# Altium PCB RADAR_D79_POWER_24V_v0.9.3.36_R10_3_36_IMPEDANCE_CLEAR_ROUTE_NATIVE.PcbDoc (part 5 of 9)
Units mil, origin at the board's own origin, x right, y up, seen from the top; angles counter-clockwise.
Board outline 3110.24 x 3110.24 mil, 10 copper layers (Top Layer, RF_GND, SIG_A0, SIG_A1, PWR_A, PWR_B, SIG_B1, SIG_B0, DIGITAL_GND, Bottom Layer), stack 79.002 mil thick; 304 components, 269 nets, 1408 pads, 1372 vias.
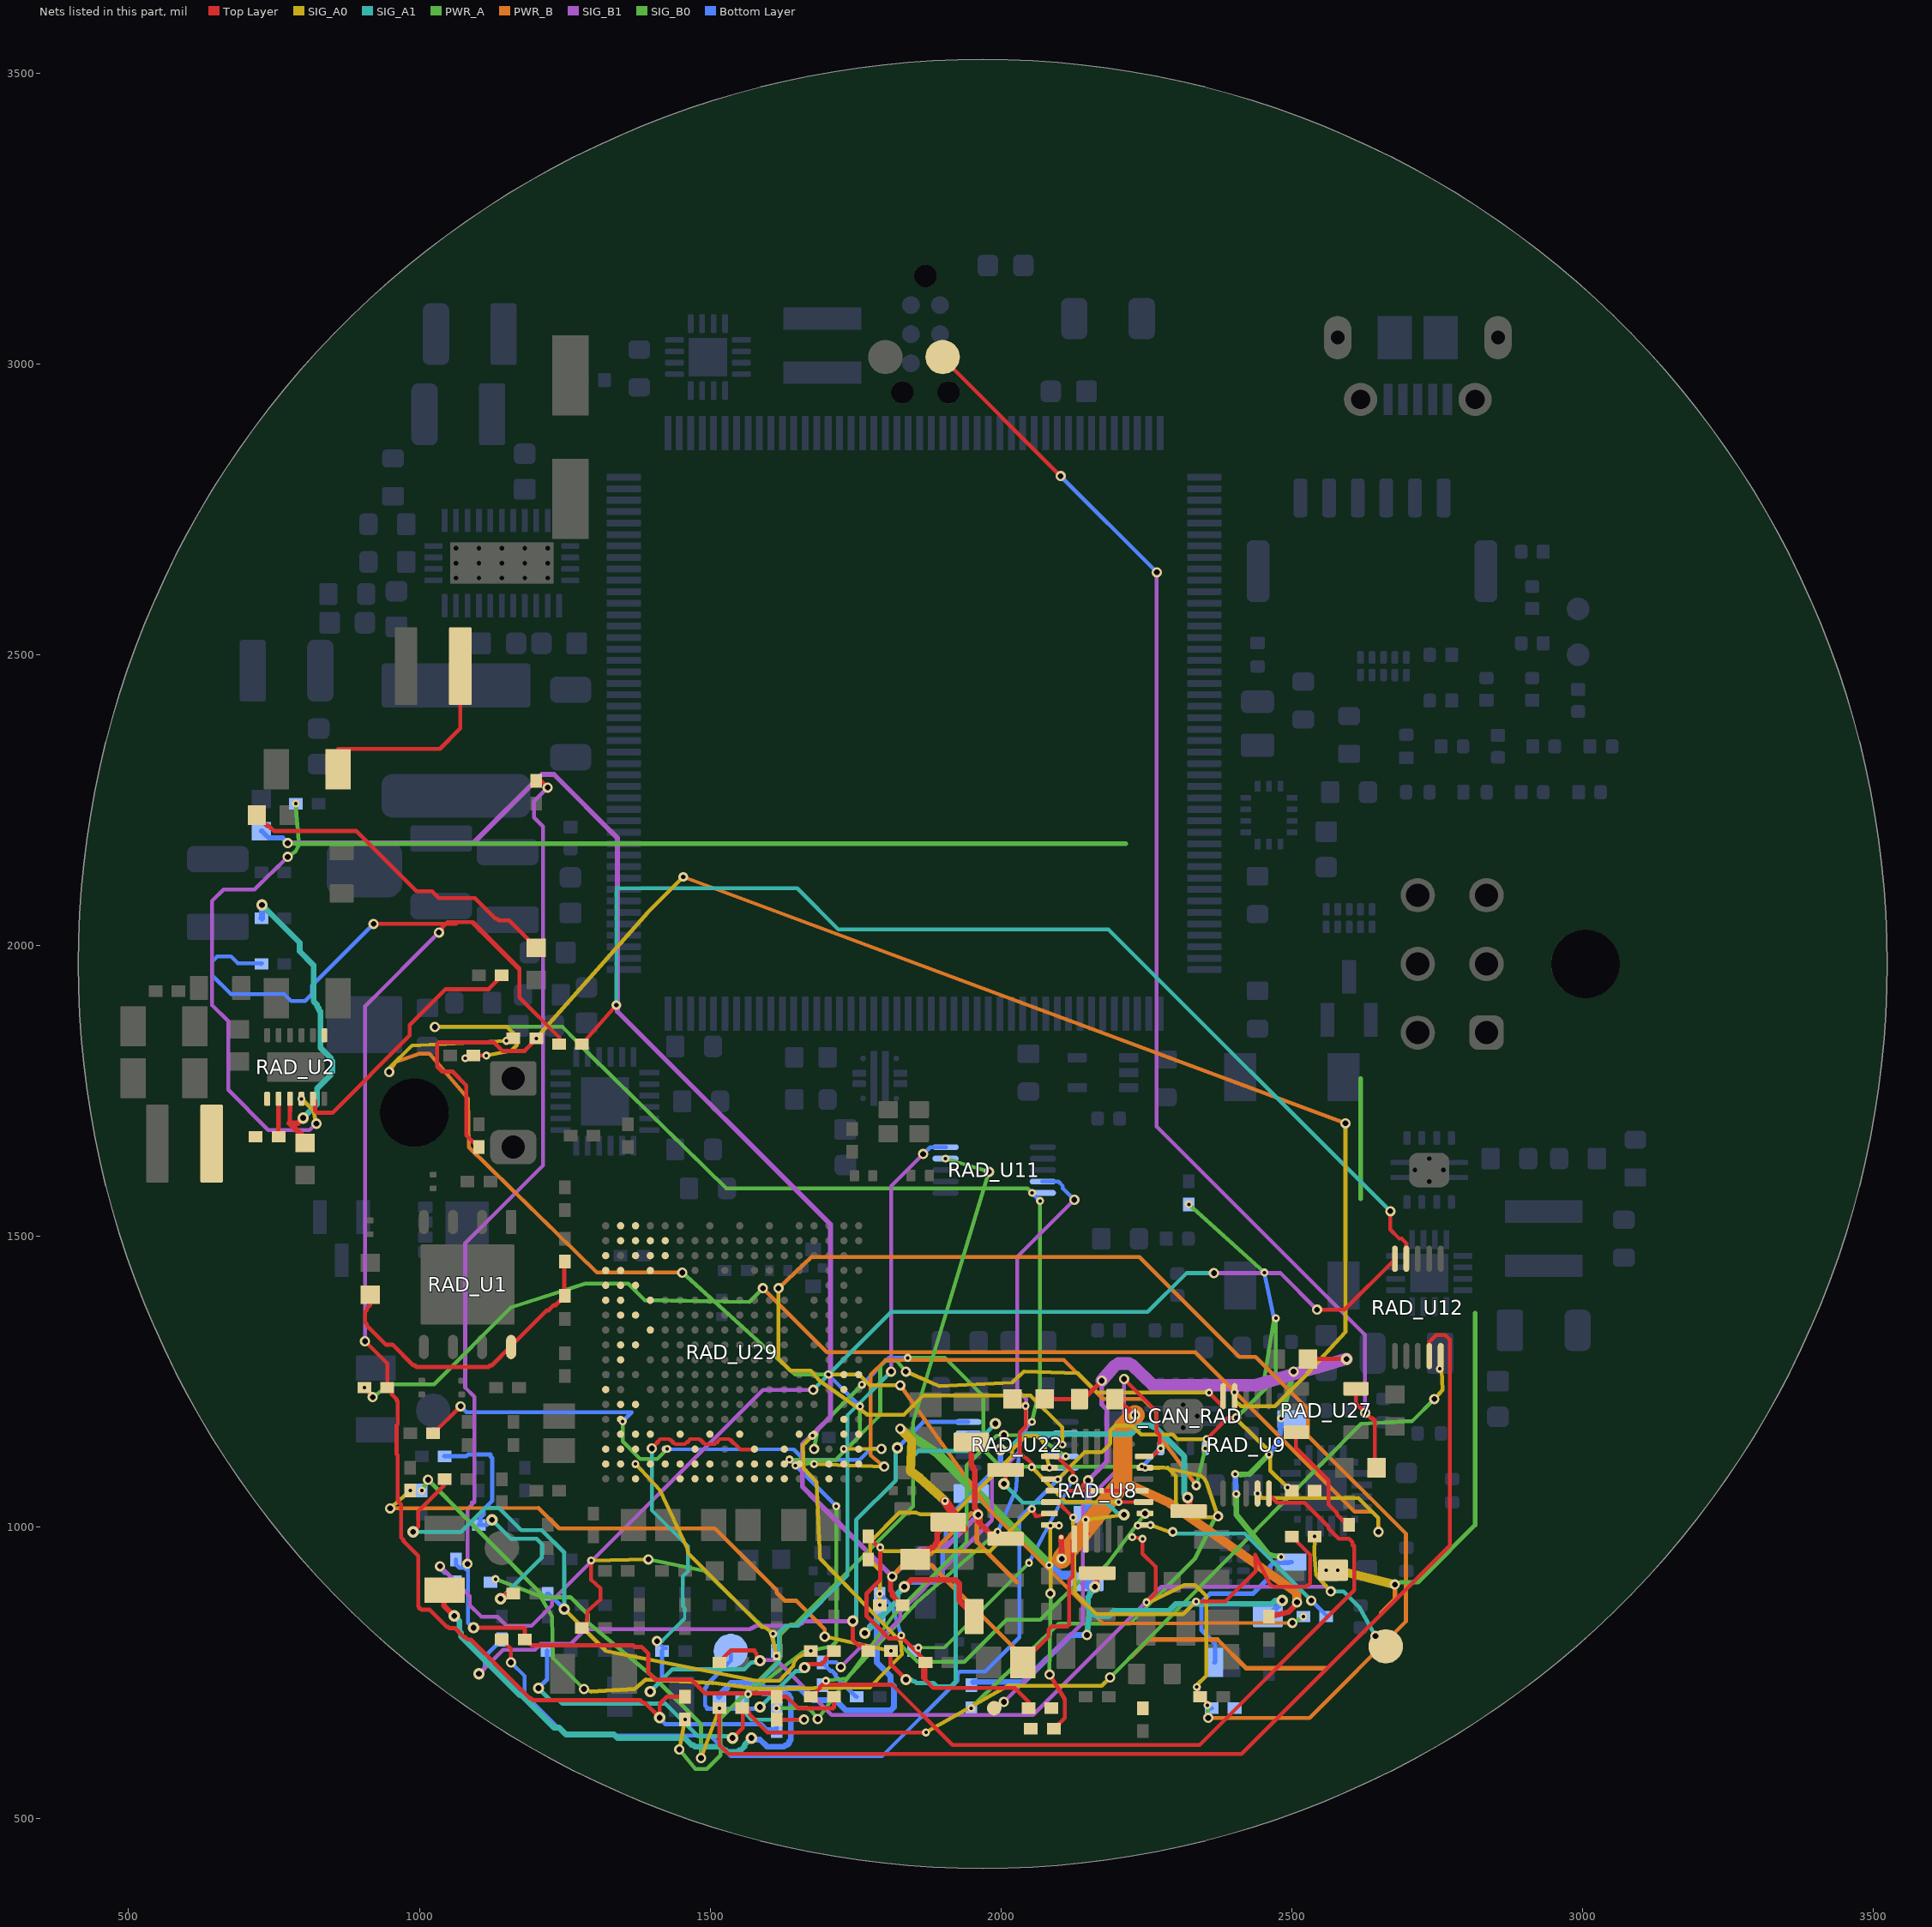
[diagram p13: the nets of this part, all layers, seen from the top]

## Via types
v1: diameter 13.77, hole 5.9, Top Layer to SIG_A0, tented both sides, 393 vias
v2: diameter 17.72, hole 9.84, Top Layer to Bottom Layer, tented both sides, 188 vias
v3: diameter 13.77/13.77/13.77 (per signal layer), hole 5.9, Top Layer to SIG_A0, tented both sides, 120 vias
v4: diameter 13.77, hole 5.9, Top Layer to SIG_A0, tented top, 104 vias
v5: diameter 19.68, hole 9.84, Top Layer to Bottom Layer, 103 vias
v6: diameter 19.68, hole 9.84, Top Layer to Bottom Layer, tented both sides, 93 vias
v7: diameter 13.78, hole 5.91, Top Layer to SIG_A0, tented both sides, 83 vias
v8: diameter 13.78, hole 5.91, SIG_B0 to Bottom Layer, tented both sides, 74 vias
v9: diameter 13.78, hole 5.91, Top Layer to SIG_A0, tented bottom, 55 vias
v10: diameter 13.78, hole 5.91, SIG_B0 to Bottom Layer, tented top, 43 vias
v11: diameter 16.54, hole 7.87, SIG_B0 to Bottom Layer, tented both sides, 22 vias
v12: diameter 22.05, hole 11.81, Top Layer to Bottom Layer, tented both sides, 17 vias
v13: diameter 17.72, hole 9.84, Top Layer to Bottom Layer, 14 vias
v14: diameter 16.54, hole 7.87, Top Layer to Bottom Layer, tented both sides, 11 vias
v15: diameter 18.11, hole 9.06, Top Layer to Bottom Layer, 7 vias
v16: diameter 22.83, hole 11.81, Top Layer to Bottom Layer, 6 vias
v17: diameter 22.05, hole 11.81, Top Layer to Bottom Layer, 6 vias
v18: diameter 22.83, hole 11.81, Top Layer to Bottom Layer, tented both sides, 5 vias
v19: diameter 17.32, hole 8.66, Top Layer to Bottom Layer, 3 vias
v20: diameter 20.47, hole 9.84, Top Layer to Bottom Layer, 3 vias
v21: diameter 16.54, hole 7.87, Top Layer to Bottom Layer, 3 vias
v22: diameter 22.05, hole 11.02, Top Layer to Bottom Layer, 2 vias
v23: diameter 19.68, hole 11.81, Top Layer to Bottom Layer, 2 vias
v24: diameter 19.68, hole 9.84, SIG_A1 to Bottom Layer, 2 vias
v25: diameter 16.54, hole 7.87, SIG_A1 to SIG_B1, tented both sides, 2 vias
v26: diameter 16.54, hole 7.87, Top Layer to SIG_A1, 2 vias
v27: diameter 13.78, hole 5.91, Top Layer to SIG_A0, 2 vias
v28: diameter 18, hole 9.84, Top Layer to Bottom Layer, tented both sides, 1 vias
v29: diameter 18.11, hole 9.06, Top Layer to Bottom Layer, tented both sides, 1 vias
v30: diameter 19.68, hole 9.84, SIG_B0 to Bottom Layer, tented both sides, 1 vias
v31: diameter 17.32, hole 7.87, Top Layer to Bottom Layer, tented both sides, 1 vias
v32: diameter 17.32, hole 7.87, SIG_A1 to Bottom Layer, tented both sides, 1 vias
v33: diameter 19.68, hole 9.84, SIG_B1 to Bottom Layer, 1 vias
v34: diameter 16.54, hole 7.87, SIG_A0 to PWR_B, tented both sides, 1 vias

## Nets (pads, with @x,y where several pads share a name; then routed paths per layer and width w, separated by ;. In a path a pad name is that pad's centre, name@x,y a point inside that pad or via, vN(x,y) a via of type N, cw(c..) or ccw(c..) an arc to the next point about the centre after c; other vN are vias at no path point) (continued)
TI_3V3REG_VCC: RAD_C10.1 RAD_R9.2 RAD_U2.3 | length 570
  Top Layer w8: 777.47,1694.53 777.25,1694.75 777.25,1715.25 777.56,1715.25 RAD_U2.3@777.56,1736.61
  Top Layer w9.84: 777.47,1694.53 776.57,1694.88 791.34,1694.88 v5(800.2,1703.74)
  Top Layer w10: 777.47,1694.75 777.47,1694.53 RAD_C10.1@803.56,1668.44
  SIG_A1 w9.84: v6(729.33,2069.88) 794.29,2004.92 794.29,1990.16 817.91,1966.54 817.91,1904.53 823.82,1898.62 823.82,1895.67 826.77,1892.72 826.77,1889.76 829.72,1886.81 829.72,1824.8 847.44,1807.09 847.44,1804.13 850.39,1801.18 850.39,1783.46 847.44,1780.51 847.44,1777.56 823.82,1753.94 823.82,1727.36 v5(800.2,1703.74)
  Bottom Layer w9.84: RAD_R9.2@728.35,2047.24 729.33,2046.26 v6(729.33,2069.88)
TI_5V0: RAD_C119.1 RAD_U8.10 | length 265.3
  Top Layer w7.09: RAD_C119.1@2037.4,767.72 2081.69,812.01 2081.69,823.82 2087.6,829.72 2114.17,829.72 2117.13,832.68 2117.13,909.45 2123.03,915.35 2123.03,977.36 2125.98,980.32 RAD_U8.10@2125.98,979.82
TI_+3.3VD: RAD_C124.2 RAD_R116.1 RAD_U8.9 | length 802
  Top Layer w9.84: RAD_U8.9@2103.41,983.08 v2(2104.33,945.87) ; RAD_C124.2@2195.87,1220.47 v2(2230.32,1192.91) ; RAD_R116.1@2460.63,846.46 2494.09,854.33 2502.95,863.19 v2(2508.86,871.06)
  PWR_B w15.75: 2209.25,1078.94 2288.19,1042.52 2505.51,889.76 2508.66,883.46 v2(2508.86,871.06)
  PWR_B w33.46: v2(2104.33,945.87) 2209.25,1078.94 2209.25,1171.06 v2(2230.32,1192.91)
TI_AGND: RAD_C3.1 RAD_C123.1 RAD_C124.1 RAD_NT1.2 RAD_NT2.1 RAD_NT3.1 RAD_NT4.1 RAD_U8.5 RAD_U8.5-19 RAD_U8.19 | length 1816.1
  Top Layer w7.09: RAD_C123.1@2074.8,1220.47 RAD_C124.1@2134.84,1220.47 ; RAD_U8.5@2088.58,1062.99 RAD_U8.19@2242.13,1062.99 ; RAD_C3.1@2527.56,1289.37 v5(2594,1289.37)
  Top Layer w7.87: 2126.97,1062.99 2125.98,1062.99 2131.89,1062.99 v2(2149.61,1080.71) ; RAD_C124.1@2134.84,1220.47 2134.84,1219.49 2140.75,1219.49 v2(2173.23,1251.97)
  SIG_B1 w7.87: v2(2149.61,1080.71) 2182.09,1113.19 2182.09,1201.77 2173.23,1210.63 v2(2173.23,1251.97)
  SIG_B1 w9.84: 2468.88,1253.31 v2(2502.95,1267.72)
  SIG_B1 w21.65: v2(2173.23,1251.97) 2195.08,1277.36 2201.97,1281.5 2219.88,1281.5 2225.39,1278.74 2261.22,1244.29 2437.6,1244.29 v5(2594,1289.37)
  SIG_B0 w9.84: v8(2402.56,1091.54) 2412.4,1090.55 2427.17,1091.54 v8(2460.63,1125) ; v8(2404.53,1057.09) 2404.53,1021.65 2460.63,952.76 v10(2481.3,948.9) ; v10(2481.3,1187.01) v2(2502.95,1267.72)
  Bottom Layer w7.09: RAD_NT1.2@2496,940.2 RAD_NT1.2@2500,940.2
  Bottom Layer w7.87: RAD_NT4.1@2366.89,767.72 2368.11,767.72 2368.11,800.2 2344.49,823.82 2344.49,871.06 2359.25,885.83 2433.07,885.83 2462.6,915.35 2462.6,933.07 2468.5,938.98 2495.08,938.98 RAD_NT1.2@2496,940.2
  Bottom Layer w9.84: v8(2402.56,1091.54) v8(2404.53,1057.09) ; v8(2460.63,1125) 2478.35,1148.62 2481.3,1177.09 v10(2481.3,1187.01)
  Bottom Layer w11.81: RAD_NT3.1@2149.61,1021.65 v2(2149.61,1080.71)
TI_AR_NERROUT: RAD_R76.1 RAD_U29.C11 | length 1017.1
  PWR_B w6.69: v2(1826.77,1244.09) 1978.35,1031.5 2175.2,834.65 v2(2500.98,835.63)
  SIG_A0 w6.69: v9(1704.16,1262.39) 1756.32,1262.39 1774.61,1244.09 v2(1826.77,1244.09)
  SIG_B0 w6.69: v2(2500.98,835.63) v10(2519.69,846.46)
TI_AR_NRST: RAD_C105.2 RAD_R99.1 RAD_R264.1 RAD_U29.H16 TP_RAD_RESET.1 | length 2378.5
  Top Layer w6.3: v2(1399.61,1135.63) 1406.69,1142.72 1406.69,1144.49 1408.46,1144.49 1408.46,1146.26 1410.24,1146.26 1410.24,1148.03 1412.01,1148.03 1412.01,1149.8 1413.78,1151.57 1429.72,1151.57 1431.5,1149.8 1433.27,1149.8 1433.27,1148.03 1435.04,1148.03 1435.04,1146.26 1436.81,1146.26 1436.81,1144.49 1438.58,1144.49 1440.35,1142.72 1456.3,1142.72 1459.84,1146.26 1461.61,1146.26 1461.61,1148.03 1463.39,1148.03 1463.39,1149.8 1465.16,1151.57 1481.1,1151.57 1482.87,1149.8 1484.65,1149.8 1484.65,1148.03 1486.42,1148.03 1486.42,1146.26 1488.19,1146.26 1488.19,1144.49 1489.96,1144.49 1491.73,1142.72 1507.68,1142.72 1511.22,1146.26 1512.99,1146.26 1512.99,1148.03 1516.54,1151.57 1532.48,1151.57 1534.25,1149.8 1536.02,1149.8 1536.02,1148.03 1537.8,1148.03 1537.8,1146.26 1539.57,1146.26 1539.57,1144.49 1541.34,1144.49 1551.97,1133.86 1576.77,1133.86 RAD_U29.H16@1576.21,1134.44
  Top Layer w7.09: RAD_R264.1@1515.75,767.72 1514.76,767.72 1535.43,788.39 1576.77,788.39 1576.77,785.43 1579.72,782.48 1579.72,776.57 v5(1585.63,770.67) ; v2(2643.7,812.99) TP_RAD_RESET.1@2661.42,795.28
  SIG_A0 w6.69: v9(2539.37,984.25) 2538.39,953.74 2541.34,918.31 v2(2566.93,889.76)
  SIG_A1 w6.3: v2(1399.61,1135.63) 1399.61,1029.33 1461.61,967.32 1461.61,924.8 1452.76,915.94 1452.76,864.57 1456.3,861.02 1456.3,843.31 1417.32,804.33 v2(1408.46,804.33)
  SIG_A1 w7.09: v5(1396.65,717.52) 1435.04,755.91 1559.06,755.91 1570.87,767.72 1582.68,767.72 v5(1585.63,770.67) ; v2(2566.93,889.76) 2588.58,889.76 2616.14,862.2 v2(2643.7,812.99)
  SIG_B1 w6.69: v5(1585.63,770.67) 1586.61,771.65 1614.17,771.65 1708.66,677.17 2055.12,677.17 2275.59,897.64 2559.06,897.64 v2(2566.93,889.76)
  Bottom Layer w6.3: v2(1408.46,804.33) 1420.87,791.93 1424.41,791.93 RAD_C105.2@1424.61,792.72
  Bottom Layer w7.09: v5(1396.65,717.52) 1417.32,738.19 1417.32,788.39 RAD_C105.2@1417.32,787.4
TI_AR_WRMRST: RAD_U29.B12
TI_BSS_UARTA_TX: RAD_U29.M16
TI_CANA_NSTB: RAD_R13.1
TI_CANB_NSTB: RAD_R17.1
TI_CSI2_RX0_0_N: RAD_U29.N18
TI_CSI2_RX0_0_P: RAD_U29.N17
TI_CSI2_RX0_1_N: RAD_U29.M18
TI_CSI2_RX0_1_P: RAD_U29.M17
TI_CSI2_RX0_CLK_N: RAD_U29.L18
TI_CSI2_RX0_CLK_P: RAD_U29.L17
TI_DSS_UARTA_RX: RAD_U29.B14
TI_DSS_UARTA_TX: RAD_U29.A15
TI_FB_B1: RAD_R14.1 RAD_U8.3 | length 547.5
  SIG_A0 w6.69: v7(1791.34,866.14) 1792.13,925.98 1774.8,943.31 1774.8,974.8 1825.2,1025.2 1853.54,1025.2 1861.42,1022.05 1918.11,1022.05 2018.9,1122.83 2018.9,1133.86 2042.52,1157.48 2061.42,1157.48 2072.44,1146.46 v7(2083.17,1102.36)
TI_FB_B2: RAD_R71.1 RAD_U8.21 | length 927.3
  SIG_A0 w6.69: v7@2245.67,1100.79 2286.61,1102.36 2300.79,1088.19 2300.79,1040.94 2324.41,1017.32 v2@2368.5,1017.32 ; v7(2247.54,1102.36) 2280.02,1102.36 2343.5,1088.58 2349.9,1083.66 2352.85,1078.25 v2(2373.03,1018.7)
  SIG_B0 w6.69: v8@1949.61,691.34 2099.21,834.65 2222.05,834.65 2333.86,946.46 v2@2368.5,1017.32
  other v8: 1948.82,688.98
TI_FB_B3: RAD_R291.1 RAD_U8.17 | length 644.3
  SIG_B0 w6.69: v8(1828.35,814.17) 1828.35,796.85 1856.69,768.5 1937.01,768.5 2009.45,840.94 2067.72,840.94 2144.88,918.11 2163.78,918.11 2184.25,938.58 v2(2247.54,1023.62)
  Bottom Layer w6.69: v8(1791.34,885.83) 1812.6,864.57 v8(1828.35,814.17)
TI_GPADC1: RAD_U29.P3
TI_GPADC2: RAD_U29.P2
TI_GPADC3: RAD_U29.R3
TI_GPADC4: RAD_U29.R2
TI_GPADC5: RAD_U29.T3
TI_GPADC6: RAD_U29.U2
TI_GPADC7: RAD_U29.T1
TI_GPADC8: RAD_U29.T2
TI_GPADC9: RAD_U29.U1
TI_GPIO_3: RAD_U29.P16
TI_GPIO_4: RAD_U29.L15
TI_GPIO_8: RAD_U29.T18
TI_GPIO_9: RAD_U29.N15
TI_GPIO_30: RAD_U29.P17
TI_GPIO_31: RAD_U29.U17
TI_LVDS_TX0_N: RAD_U29.F18
TI_LVDS_TX0_P: RAD_U29.F17
TI_LVDS_TX1_N: RAD_U29.J18
TI_LVDS_TX1_P: RAD_U29.J17
TI_LVDS_TX2_CLK_N: RAD_U29.G18
TI_LVDS_TX2_CLK_P: RAD_U29.G17
TI_LVDS_TX3_FRCLK_N: RAD_U29.H18
TI_LVDS_TX3_FRCLK_P: RAD_U29.H17
TI_MCU_CLK_OUT: RAD_U29.R15
TI_MSS_EPWMA0: RAD_U29.E15
TI_MSS_EPWMA1: RAD_U29.C18
TI_MSS_EPWMB0: RAD_U29.C17
TI_MSS_GPIO_0: RAD_U29.B15
TI_MSS_GPIO_1: RAD_U29.A16
TI_MSS_GPIO_11: RAD_U29.J15
TI_MSS_GPIO_28: RAD_U29.R17
TI_MSS_I2CA_SCL: RAD_R27.2 RAD_R33.2 RAD_R57.2 RAD_R58.2 RAD_R276.1 | length 2325.4
  Top Layer w6.69: RAD_R276.1@1200.79,2283.46 1208.66,2283.46 v2(1220.47,2271.65)
  Top Layer w7.09: v5(1093,827.28) 1180,827.28 1181.1,826.18 RAD_R57.2@1181.1,807.09 1181.1,806.1 1187.01,800.2 1189.96,800.2 1192.91,797.24 1367.13,797.24 1370.08,794.29 1381.89,794.29 1393.7,782.48 1393.7,750 1405.51,738.19 1467.52,738.19 1491.14,714.57 1609.25,714.57 1615.16,708.66 RAD_R33.2@1614.17,708.66 1631.34,708.66 1651,689 1711.6,689 1712.6,690 RAD_R27.2@1712.6,708.66
  SIG_B1 w6.69: v2(1082.68,937.01) 1082.68,1031.5 1090.55,1039.37 1090.55,1043.31 1094.49,1043.31 1094.49,1224.41 1078.74,1240.16 1078.74,1488.19 1212.6,1622.05 1212.6,2204.72 1196.85,2220.47 1196.85,2248.03 v2(1220.47,2271.65)
  Bottom Layer w6.69: v2(1082.68,937.01) 1082.68,925.2 1083.66,927.16
  Bottom Layer w7.09: RAD_R58.2@1062.99,944.88 1062.99,937 1062.99,936.02 1068.9,930.12 1077.76,930.12 1080.71,927.17 1083.66,927.17 1083.66,835.63 1092.52,826.77 v5(1093,827.28)
TI_MSS_I2CA_SDA: RAD_R29.2 RAD_R35.2 RAD_R59.2 RAD_R62.2 RAD_R277.1 | length 3308.9
  Top Layer w6.3: v2(906.5,1319.88) 944.88,1281.5 RAD_R29.2@944.88,1240.16 ; v2(1033.46,2022.64) 1039.37,2028.54 1039.37,2031.5 1048.23,2040.35 1089.57,2040.35 1172.24,1957.68 1172.24,1910.43 1240.16,1842.52 RAD_R59.2@1240.16,1830.71
  Top Layer w6.69: v2(921.26,2037.4) 1062.99,2037.4 1065.94,2040.35 1092.52,2040.35 1172.24,1960.63 1172.24,1910.43 1240.16,1842.52 RAD_R59.2@1240.16,1830.71
  Top Layer w7.09: RAD_R29.2@944.88,1240.16 952.76,1232.28 952.76,1228.35 960.63,1220.47 960.63,1218.5 962.6,1216.54 962.6,1177.17 960.63,1175.2 960.63,1125.98 962.6,1124.02 962.6,1047.24 964.57,1045.28 964.57,1043.31 968.5,1039.37 968.5,982.28 972.44,978.35 972.44,976.38 998.03,950.79 998.03,864.17 1000,862.2 1000,860.24 1001.97,860.24 1003.94,858.27 1017.72,858.27 1047.24,828.74 1049.21,828.74 1051.18,826.77 1061.02,826.77 1076.77,811.02 1078.74,811.02 1082.68,807.09 1088.58,807.09 1188.98,706.69 1190.94,706.69 1194.88,702.76 1379.92,702.76 1383.86,698.82 1385.83,698.82 1387.8,696.85 1389.76,696.85 1413.39,673.23 v5(1413,672.68) 1413,696.16 1425.5,708.66 RAD_R35.2@1456.69,708.66
  SIG_B1 w6.3: v2(906.5,1319.88) 906.5,1895.67 v2(1033.46,2022.64)
  Bottom Layer w6.69: RAD_R277.1@728.35,1968.5 729.33,1969.49 687.99,1969.49 676.18,1981.3 652.56,1981.3 643.7,1972.44 643.7,1948.82 676.18,1916.34 767.72,1916.34 779.53,1904.53 803.15,1904.53 814.96,1916.34 814.96,1931.1 v2(921.26,2037.4)
  Bottom Layer w7.09: v5(1413,672.68) 1414.37,673.23 1417.32,670.28 1417.32,667.32 1423.23,661.42 1588.58,661.42 1597.44,652.56 1612.2,652.56 1615.16,649.61 RAD_R62.2@1614.17,649.61 1614.17,663.59 1613,664.76
TI_MSS_MCANA_RX: RAD_U29.D16 U_CAN_RAD.4 | length 818.4
  SIG_B0 w6.69: v13(1678.57,1134.44) 1685.04,1169.29 v8(1760.83,1245.08) ; v8(1839.57,1291.34) 1903.54,1291.34 1969.49,1225.39 1969.49,1133.86 1999.02,1104.33 v8(2242.13,1104.33)
  Bottom Layer w6.69: v8(1760.83,1245.08) 1807.09,1291.34 v8(1839.57,1291.34) ; v8(2242.13,1104.33) U_CAN_RAD.4@2273.23,1135.83
  other v10: 2274.61,1135.83
TI_MSS_MCANA_TX: RAD_U29.D17 U_CAN_RAD.1 | length 1042.8
  PWR_B w6.69: v2(1799.21,1104.33) 1775.59,1124.02 1775.59,1261.81 1801.18,1287.4 2108.27,1287.4 2175.2,1220.47 2244.09,1220.47 2267.72,1196.85 2267.72,1163.39 v14(2335.63,1071.85)
  SIG_A0 w6.69: v9(1678.57,1108.85) v2(1799.21,1104.33)
  SIG_B0 w6.69: v14(2335.63,1071.85) v10(2351.38,1135.83)
TI_MSS_MCANB_RX: RAD_U29.A17
TI_MSS_MCANB_TX: RAD_U29.B17
TI_MSS_MDIO_CLK: RAD_U29.R4
TI_MSS_MDIO_DATA: RAD_U29.T5
TI_MSS_RGMII_RCLK: RAD_U29.T9
TI_MSS_RGMII_RCTL: RAD_U29.T7
TI_MSS_RGMII_RD0: RAD_U29.V6
TI_MSS_RGMII_RD1: RAD_U29.V4
TI_MSS_RGMII_RD2: RAD_U29.V5
TI_MSS_RGMII_RD3: RAD_U29.U10
TI_MSS_RGMII_TCLK: RAD_U29.V3
TI_MSS_RGMII_TCTL: RAD_U29.R6
TI_MSS_RGMII_TD0: RAD_U29.U7
TI_MSS_RGMII_TD1: RAD_U29.U5
TI_MSS_RGMII_TD2: RAD_U29.U6
TI_MSS_RGMII_TD3: RAD_U29.U4
TI_MSS_RS232RX: RAD_U29.F16
TI_MSS_RS232TX: RAD_U29.E17
TI_MSS_SPIA_CLK: RAD_U29.T16
TI_MSS_SPIA_CS0: RAD_U29.T15
TI_MSS_SPIA_HOSTIRQ: RAD_U29.V17
TI_MSS_SPIA_MOSI: RAD_U29.U15
TI_MSS_SPIB_CS0: RAD_U29.U14
TI_MSS_SPIB_CS1: RAD_U29.V16
TI_MSS_SPIB_MISO: RAD_U29.U13
TI_MSS_UARTA_RX: RAD_R129.1 RAD_U29.B16 | length 966.9
  Top Layer w6.69: RAD_R129.1@1023.62,1161.42 1024.02,1161.22 v13(1070.87,1208.07)
  SIG_A0 w6.3: v9(1729.75,1134.44) v13(1794.29,1134.84)
  SIG_B0 w6.69: v8(1349.41,1182.09) 1349.41,1147.64 1379.92,1117.13 1408.46,1117.13 v8(1426.18,1134.84)
  Bottom Layer w6.69: v13(1070.87,1208.07) 1080.91,1198.03 1365.35,1198.03 v8(1349.41,1182.09) ; v8(1426.18,1134.84) 1428.94,1134.45 1643.7,1133.86 1661.42,1116.14 1738.19,1116.14 1756.89,1116.14 1775.59,1134.84 v13(1794.29,1134.84)
TI_NERR_MCU: RAD_R76.2 RAD_U8.16 | length 388.5
  Top Layer w6.69: v7(2235.24,1002.95) 2246.08,1003.34 v7(2257.09,1003.74) ; RAD_U8.16@2246.06,1003.94 RAD_U8.16@2247.05,1003.94
  SIG_A0 w6.69: v7(2257.09,1003.74) v14@2297.64,988.98
  SIG_A1 w6.69: v14@2297.64,988.98 2418.9,988.98 v2(2533.46,874.02)
  Bottom Layer w6.69: v2(2533.46,874.02) 2560.04,847.44 RAD_R76.2@2559.06,846.46
  other v14: 2295.28,992.13
TI_NetC1_2: RAD_C1.2 RAD_C2.2 RAD_R37.2 RAD_U1.8 | length 540
  Top Layer w7.09: RAD_C1.2@915.35,1399.61 915.35,1381.89 909.45,1375.98 909.45,1373.03 906.5,1370.08 906.5,1352.36 909.45,1349.41 909.45,1346.46 941.93,1313.98 953.74,1313.98 989.17,1278.54 992.13,1278.54 995.08,1275.59 1119.09,1275.59 1122.05,1278.54 1125,1278.54 RAD_U1.8@1157.48,1311.02 ; RAD_U1.8@1157.68,1309.98 RAD_U1.8@1157.48,1311.02 ; RAD_C2.2@1250,1397.64 RAD_C2.2@1249.02,1396.65 ; RAD_R37.2@1250,1456.69 1249.02,1455.71 RAD_C2.2@1249.02,1396.65 ; RAD_U1.8@1157.48,1311.02 1219.49,1373.03 1222.44,1373.03 1231.3,1381.89 1234.25,1381.89 RAD_C2.2@1249.02,1396.65
TI_NetC14_1: RAD_C14.1 RAD_R26.2 RAD_U9.9 | length 2626
  Top Layer w6.69: RAD_U9.9@2401.57,1225.39 v9(2401.57,1232.28)
  Top Layer w7.09: RAD_R26.2@1102.36,1653.54 1101.38,1653.54 1080.71,1674.21 1080.71,1759.84 1057.09,1783.46 1039.37,1783.46 1030.51,1792.32 1030.51,1830.71 1033.46,1833.66 1127.95,1833.66 1142.72,1818.9 1181.1,1818.9 1201.77,1839.57 v9(1200.79,1840.55)
  PWR_B w6.69: v34(1453.54,2118.11) v2(2592.13,1694.49)
  SIG_A0 w6.69: v9(1200.79,1840.55) 1392.13,2056.69 v34(1453.54,2118.11) ; v9(2401.57,1232.28) 2401.57,1218.9 2412.6,1207.87 2470.87,1207.87 2521.26,1258.27 2592.13,1335.43 v2(2592.13,1694.49)
TI_NetC14_2: RAD_C14.2 RAD_R32.2 RAD_U9.10 | length 3012.8
  Top Layer w6.69: v7(1149.61,1836.22) RAD_C14.2@1168.5,1835.43 ; v7(2357.48,1231.5) 2381.69,1207.48 RAD_U9.10@2381.69,1225.39
  PWR_B w6.69: v2(948.03,1782.68) 959.06,1800 1000,1814.17 1017.32,1814.17 1083.46,1737.01 1085.04,1653.54 1305.51,1437.8 v2(1451.97,1437.8)
  SIG_A0 w6.69: v2(948.03,1782.68) 948.03,1788.98 987.4,1828.35 v7(1149.61,1836.22) ; v2(1836.22,1267.72) 1894.49,1242.52 2018.9,1248.82 2039.37,1267.72 2132.28,1264.57 2165.35,1231.5 v7(2357.48,1231.5)
  SIG_B0 w6.69: v2(1451.97,1437.8) 1645.67,1262.99 v8(1702.36,1262.99) ; v10(1565.35,713.39) 1659.84,785.83 1708.66,795.28 1716.54,803.15 v8(1716.54,1036.22) ; v8(1636.22,1116.54) 1674.02,1114.96 1714.96,1114.96 1757.48,1157.48 v8(1757.48,1207.87) ; v8(1646.65,1106.3) 1715.55,1116.14 1792.32,1192.91 1792.32,1277.56 1801.57,1286.61 1820.47,1286.61 v2(1836.22,1267.72)
  Bottom Layer w6.69: RAD_R32.2@1562.2,713.78 v10(1565.35,713.39) ; v8(1646.65,1106.3) v8(1636.22,1116.54) v8(1716.54,1036.22) ; v8(1702.36,1262.99) v8(1757.48,1207.87)
TI_NetC17_1: RAD_C17.1 RAD_R47.2 RAD_U11.9 | length 1192.1
  SIG_B1 w6.69: v2(1724.41,759.84) 1759.84,795.28 1779.53,795.28 1826.77,842.52 1826.77,854.33 1984.25,1011.81 1984.25,1090.55 2003.94,1110.24 2011.81,1110.24 2031.5,1129.92 2031.5,1157.48 2043.31,1169.29 2043.31,1220.47 2027.56,1236.22 2027.56,1464.57 v2(2125.98,1562.99)
  Bottom Layer w6.69: RAD_C17.1@1692.91,767.72 1716.54,767.72 v2(1724.41,759.84) ; RAD_U11.9@2071.85,1594.49 2070.87,1594.49 2098.43,1594.49 2106.3,1586.61 2106.3,1582.68 v2(2125.98,1562.99)
  Bottom Layer w7.09: RAD_C17.1@1692.91,767.72 1691.93,767.72 1706.69,752.95 1709.65,752.95 1715.55,747.05 1715.55,744.09 1750.98,708.66 RAD_R47.2@1751.97,708.66
TI_NetC17_2: RAD_C17.2 RAD_R65.2 RAD_U11.10 | length 2403.8
  Top Layer w6.69: v7(1078.74,1806.3) RAD_R65.2@1099.61,1805.91 ; RAD_R65.2@1099.61,1811.02 v7(1115.16,1811.02)
  SIG_A0 w6.69: v2(1026.57,1860.24) 1150.59,1860.24 1167.32,1843.5 1167.32,1828.74 1157.48,1818.9 v7(1115.16,1811.02)
  SIG_B0 w6.69: v2(1026.57,1860.24) 1246.06,1860.24 1292.91,1812.6 1527.56,1582.68 2045.67,1582.68 v10(2053.54,1574.8) ; v10(1698.82,736.22) 1734.25,740.16 1856.3,872.05 v8(1994.09,992.13) ; v8(2053.15,1181.1) 2066.93,1240.16 v8(2066.93,1561.02)
  Bottom Layer w6.69: RAD_C17.2@1698.03,735.43 v10(1698.82,736.22) ; v8(1994.09,992.13) 2025.59,1064.96 2033.46,1161.42 v8(2053.15,1181.1) ; v10(2053.54,1574.8) RAD_U11.10@2053.94,1575 ; RAD_U11.10@2053.94,1574.61 v8(2066.93,1561.02)
TI_NetC19_1: RAD_C19.1 RAD_R348.2 RAD_U12.9 | length 2714.4
  Top Layer w6.69: v9(1515.75,688.98) 1515.75,625.98 1531.5,610.24 2413.39,610.24 2771.65,968.5 2771.65,1322.83 2763.78,1330.71 2748.03,1330.71 2736.22,1318.9 2736.22,1295.28 RAD_U12.9@2736.22,1294.29
  PWR_A w7.09: v2(1014.76,1081.69) 1214.57,879.92 1259.84,879.92 1289.37,850.39 1289.37,836.61 1407.48,738.19 1484.25,661.42 v2(1484.25,603.35)
  SIG_A0 w6.69: v2(1484.25,603.35) v9(1515.75,688.98)
  SIG_B0 w6.69: v10(1003.94,1062.99) v2(1014.76,1081.69)
TI_NetC19_2: RAD_C19.2 RAD_R352.2 RAD_U12.10 | length 1995.2
  Top Layer w6.69: RAD_C19.2@1562.2,694.09 1568.5,677.17 1598.43,647.24 v7(1870.87,647.24) ; v9(2754.33,1272.44) RAD_U12.10@2755.71,1276.38
  Top Layer w7.09: v5(1538.39,637.8) 1556.1,655.51 1556.1,687.99 RAD_C19.2@1555.12,688.98
  PWR_A w6.69: v2(2187.4,741.73) 2618.9,1177.95 2707.09,1182.68 v2(2744.88,1220.47)
  SIG_A0 w6.69: v7(1870.87,647.24) 2012.6,727.56 2173.23,727.56 v2(2187.4,741.73) ; v2(2744.88,1220.47) 2759.06,1236.22 2757.48,1269.29 v9(2754.33,1272.44)
  SIG_A1 w7.09: v5(1204.72,723.43) 1225.39,702.76 1240.16,702.76 1246.06,696.85 1423.23,696.85 1479.33,640.75 1535.43,640.75 v5(1538.39,637.8)
  Bottom Layer w7.09: v5(1204.72,723.43) 1219.49,738.19 1219.49,788.39 RAD_R352.2@1220.47,787.4
TI_NetC21_1: RAD_C21.1 RAD_U2.2 | length 65.2
  Top Layer w8: RAD_C21.1@757.87,1671.39 RAD_U2.2@757.87,1736.61
TI_NetC21_2: RAD_C21.2 RAD_L6.1 RAD_U2.1
TI_NetC81_1: RAD_C81.1 RAD_R56.2 RAD_U22.9 | length 1806.5
  Top Layer w7.09: v9(1811.02,787.4) 1810.04,788.39 1810.04,764.76 v5(1836.61,738.19)
  PWR_B w7.09: v2(949.8,1032.48) 1204.72,1033.46 1240.16,998.03 1507.87,998.03 1614.17,891.73 1614.17,887.8 1627.95,874.02 1647.64,874.02 1696.85,824.8 v2(1696.85,812.01)
  SIG_A0 w6.69: v2(949.8,1032.48) v9(984.25,1062.99) ; v2(1696.85,812.01) v9(1811.02,787.4)
  SIG_A1 w7.09: v5(1836.61,738.19) 1845.47,738.19 1848.43,735.24 1851.38,735.24 1854.33,732.28 1883.86,732.28 1889.76,726.38 1913.39,726.38 1922.24,735.24 1922.24,1024.61 1848.43,1098.43 1848.43,1122.05 1857.28,1130.91 1942.91,1130.91 v5(1990.16,1178.15)
  Bottom Layer w7.09: RAD_U22.9@1943.9,1161.42 1942.91,1160.43 1972.44,1160.43 v5(1990.16,1178.15)
TI_NetC81_2: RAD_C81.2 RAD_R66.2 RAD_U22.10 | length 1295.4
  Top Layer w7.09: v5(1745.08,838.58) 1745.08,806.1 1753.94,797.24 1762.8,797.24 1771.65,788.39 RAD_C81.2@1771.65,787.4
  SIG_A1 w7.09: v5(1745.08,838.58) 1750.98,844.49 1750.98,1012.8 1818.9,1080.71 1818.9,1133.86 v5(1821.85,1136.81)
  SIG_B1 w7.09: v6(1102.36,748.03) 1143.7,789.37 1198.82,789.37 1208.66,799.21 1259.84,799.21 1285.43,824.8 1568.9,824.8 1570.87,826.77 1572.83,826.77 1574.8,828.74 1576.77,828.74 1578.74,830.71 1651.57,830.71 1655.51,834.65 1657.48,834.65 1661.42,838.58 1746.06,838.58 v5(1745.08,838.58)
  Bottom Layer w7.09: v6(1102.36,748.03) 1112.2,757.87 1112.2,777.56 RAD_R66.2@1141.73,807.09 ; v5(1821.85,1136.81) 1866.14,1181.1 1942.91,1181.1 RAD_U22.10@1943.9,1181.1
TI_NetC100_1: RAD_C100.1 RAD_L5.1 | length 366.7
  Top Layer w7.09: RAD_C100.1@860.24,2303.15 860.24,2338.24 1035.24,2338.24 1070.28,2373.28 RAD_L5.1@1070.28,2480.32
TI_NetC104_1: RAD_C104.1 RAD_C126.1 | length 577.4
  Top Layer w7.09: RAD_C104.1@720.47,2224.41 720.47,2223.43 738.19,2205.71 741.14,2205.71 750,2196.85 891.73,2196.85 995.08,2093.5 1021.65,2093.5 1033.46,2081.69 1095.47,2081.69 1130.91,2046.26 1133.86,2046.26 1136.81,2043.31 1154.53,2043.31 1201.77,1996.06 RAD_C126.1@1200.79,1996.06
TI_NetC123_2: RAD_C123.2 RAD_U8.18 | length 362
  Top Layer w6.69: RAD_C123.2@2019.69,1220.47 v7(2042.32,1208.66) 2042.32,1173.23 2032.48,1163.39 2032.48,1127.95 2040.35,1120.08 2043.31,1119.09 2052.66,1110.24 v7(2052.66,1103.35) ; v7(2202.26,1043.31) RAD_U8.18@2233.07,1043.5
  Top Layer w7.09: RAD_U8.18@2233.07,1043.5 2233.07,1043.31 RAD_U8.18@2245.08,1043.31
  SIG_A0 w6.69: v7(2052.66,1103.35) 2110.24,1044.09 v7(2202.26,1043.31)
TI_NetC149_2: RAD_C149.2 RAD_P1.2 RAD_U27.5 | length 2326.3
  Top Layer w6.69: RAD_P1.2@1899.61,3011.81 1897.64,3011.81 v2(2102.36,2807.09) ; RAD_U27.5@2610.24,1238.19 2610.24,1240.16 2610.24,1212.6 v2(2625.98,1196.85)
  Top Layer w7.09: RAD_U27.5@2610.24,1238.19 2610.24,1237.2 2610.24,1213.58 2636.81,1187.01 2639.76,1187.01 2639.76,1184.06 2642.72,1184.06 2642.72,1104.33 2645.67,1101.38 RAD_C149.2@2645.67,1102.36
  SIG_B1 w6.69: v2(2267.72,2641.73) 2267.72,1688.98 2625.98,1330.71 v2(2625.98,1196.85)
  Bottom Layer w6.69: v2(2102.36,2807.09) v2(2267.72,2641.73)
TI_NetJ17_1: RAD_R300.2 TP_RAD_FLASH.1 | length 383.7
  Top Layer w7.09: v5(1662.4,758.86) 1668.31,764.76 1691.93,764.76 1697.83,770.67 1697.83,773.62 1712.6,788.39 RAD_R300.2@1712.6,787.4
  SIG_A1 w7.09: v5(1585.63,690.94) 1647.64,752.95 1656.5,752.95 v5(1662.4,758.86)
  Bottom Layer w7.09: TP_RAD_FLASH.1@1535.43,787.4 1535.43,788.39 1535.43,770.67 1494.09,729.33 1494.09,726.38 1491.14,723.43 1491.14,693.9 1494.09,690.94 1494.09,687.99 1582.68,687.99 v5(1585.63,690.94)
TI_NetL1_1: RAD_L1.1 RAD_U8.11 | length 325.7
  Top Layer w7.09: v5(2004.92,1074.8) 2007.87,1077.76 RAD_L1.1@2007.87,1098.43 ; RAD_U8.11@2145.67,987.2 2146.65,986.22 RAD_U8.11@2149.61,989.17
  SIG_A0 w7.09: v9(2145.67,1012.8) v5(2211.61,1021.65)
  SIG_A1 w7.09: v5(2004.92,1074.8) 2037.4,1042.32 2182.09,1042.32 2199.8,1024.61 2208.66,1024.61 v5(2211.61,1021.65)
TI_NetR1_1: RAD_R1.1 RAD_U2.5 | length 455.2
  Top Layer w7.09: RAD_U2.5@816.93,1736.61 817.91,1736.22 820.87,1733.27 820.87,1715.55 823.82,1712.6 850.39,1712.6 983.27,1845.47 983.27,1863.19 1045.28,1925.2 1119.09,1925.2 1142.72,1948.82 RAD_R1.1@1141.73,1948.82
TI_NetR2_2: RAD_R2.2 RAD_U2.4 | length 833.4
  SIG_A0 w6.69: v9(797.24,1736.61) 817.91,1715.55 v2(822.83,1693.9)
  SIG_B1 w6.69: v2(773.62,2152.56) 716.54,2096.46 663.39,2096.46 643.7,2076.77 643.7,1897.64 671.26,1870.08 671.26,1751.97 740.16,1683.07 811.02,1683.07 v2(822.83,1693.9)
  SIG_B0 w6.69: v2(773.62,2152.56) 787.4,2162.4 792.32,2171.26 792.32,2180.12 v10(787.4,2244.09)
TI_NetR3_2: RAD_U29.U9
TI_NetR4_2: RAD_U2.7
TI_NetR27_1: RAD_R27.1 RAD_U9.5 | length 1364.9
  Top Layer w6.69: RAD_R27.1@1673.23,708.66 1674.21,708.66 1688.98,723.43 1688.98,726.38 1691.93,729.33 1812.99,729.33 1916.34,625.98 2341.54,625.98 2607.28,891.73 2607.28,968.5 2604.33,968.5 2604.33,974.41 2598.43,980.32 2580.71,980.32 2562.99,998.03 2562.99,1000.98 2521.65,1042.32 2474.41,1042.32 2459.65,1057.09 RAD_U9.5@2460.63,1058.07
TI_NetR29_1: RAD_R29.1 RAD_U9.4 | length 2277.2
  Top Layer w6.69: v7(905.51,1240.16) v2(919.68,1223.62)
  PWR_A w6.69: v2(919.68,1223.62) 949.61,1245.67 1025.2,1245.67 1157.48,1377.95 1285.04,1418.9 1359.06,1418.9 1387.4,1390.55 1566.93,1387.4 v2(1590.55,1411.02)
  PWR_B w6.69: v2(1590.55,1411.02) 1700.79,1300.79 2333.86,1300.79 2607.87,1026.77 2637.8,1026.77 2648.82,1015.75 v2(2648.82,992.13)
  SIG_A0 w6.69: v7(2440.94,1058.07) 2448.82,1050.39 2614.17,1050.39 2648.82,1015.75 v2(2648.82,992.13)
TI_NetR31_2: RAD_U29.R8
TI_NetR33_1: RAD_R33.1 RAD_U11.5 | length 1295.8
  Top Layer w6.69: RAD_R33.1@1614.17,669.29 v2(1661.42,669.29)
  SIG_A1 w6.69: v2(1661.42,669.29) 1570.87,669.29 1562.99,677.17 1562.99,712.6 1618.11,767.72 1618.11,818.9 1629.92,830.71 1649.61,830.71 1736.22,917.32 1736.22,1192.91 v2(1811.02,1267.72)
  SIG_B1 w6.69: v2(1811.02,1267.72) 1811.02,1586.61 v2(1866.14,1641.73)
  Bottom Layer w6.69: v2(1866.14,1641.73) 1877.95,1653.54 1905.51,1653.54 RAD_U11.5@1904.53,1653.54
TI_NetR35_1: RAD_R35.1 RAD_U11.4 | length 1390.7
  PWR_A w6.69: v2(1446.85,618.11) 1474.41,584.65 1494.09,584.65 1517.72,608.27 1517.72,671.26 1620.08,773.62 1620.08,814.96 1637.8,832.68 1645.67,832.68 1848.43,1035.43 1848.43,1179.13 v2(1979.33,1611.22)
  SIG_A0 w6.69: v2(1446.85,618.11) v9(1456.69,669.29)
  SIG_B0 w6.69: v10(1904.53,1633.86) v2(1979.33,1611.22)
TI_NetR57_1: RAD_R57.1 RAD_U22.5 | length 1421.9
  Top Layer w6.69: RAD_R57.1@1141.73,807.09 1157.48,791.34 v2(1157.48,767.72)
  Bottom Layer w6.69: v2(1157.48,767.72) 1181.1,744.09 1181.1,712.6 1251.97,641.73 1500,641.73 1535.43,606.3 1795.28,606.3 1925.2,736.22 1925.2,748.03 1929.13,751.97 1972.44,751.97 2031.5,811.02 2031.5,1015.75 2110.24,1094.49 2110.24,1102.36 RAD_U22.5@2111.22,1102.36
TI_NetR58_1: RAD_R58.1 RAD_U12.5 | length 2053.3
  Top Layer w6.69: v2(2543.31,1374.02) 2590.55,1374.02 2677.17,1460.63 RAD_U12.5@2677.17,1461.61
  SIG_A1 w6.69: v2(1677.17,1236.22) 1811.02,1370.08 2251.97,1370.08 2318.9,1437.01 v2(2366.14,1437.01)
  SIG_B1 w6.69: v2(1035.43,933.07) 1086.61,881.89 1086.61,866.14 1106.3,846.46 1133.86,846.46 1149.61,830.71 1192.91,830.71 1228.35,866.14 1228.35,874.02 1590.55,1236.22 v2(1677.17,1236.22) ; v2(2366.14,1437.01) 2480.32,1437.01 v2(2543.31,1374.02)
  Bottom Layer w6.69: v2(1035.43,933.07) 1035.43,929.13 1043.31,921.26 1047.24,921.26 RAD_R58.1@1062.99,905.51
TI_NetR59_1: RAD_R59.1 RAD_U12.4 | length 1948.1
  Top Layer w6.69: RAD_R59.1@1279.53,1830.71 v26(1338.58,1897.64) ; v2(2669.29,1543.31) 2669.29,1511.81 2685.04,1496.06 2688.98,1496.06 2696.85,1488.19 2696.85,1460.63 RAD_U12.4@2696.85,1461.61
  SIG_A1 w6.69: v26(1338.58,1897.64) 1338.58,2098.43 1649.61,2098.43 1720.47,2027.56 2185.04,2027.56 v2(2669.29,1543.31)
TI_NetR62_1: RAD_R62.1 RAD_U22.2 RAD_U22.4 | length 913.7
  PWR_A w6.69: v2(1685.04,670.28) 1814.96,848.43 1940.94,974.41 1940.94,1106.3 1992.13,1157.48 v2(2004.92,1158.46)
  SIG_B0 w6.69: v10(1614.17,688.98) 1666.34,688.98 1673.23,685.04 v2(1685.04,670.28) ; v2(2004.92,1158.46) 2060.04,1157.48 v10(2111.22,1122.05)
  Bottom Layer w7.09: v10(2111.22,1122.05) 2108.27,1125 2081.69,1125 2075.79,1130.91 2075.79,1151.57 2078.74,1154.53 2078.74,1157.48 2108.27,1157.48 2111.22,1160.43 RAD_U22.2@2111.22,1161.42
TI_NetR63_1: RAD_R63.1 RAD_U8.1 | length 2624.5
  PWR_B w6.69: v2(1617.32,1411.02) 1674.02,1464.57 2237.8,1464.57 2409.45,1292.91 2437.8,1292.91 2527.56,1203.15 2527.56,1157.48 2696.06,988.98 2696.06,837.8 2530.71,672.44 v2(2356.3,672.24)
  SIG_A0 w6.69: v2(1617.32,1411.02) 1617.32,1289.76 1637.8,1269.29 1672.44,1269.29 1689.76,1250.39 1770.08,1193.7 1833.07,1193.7 1866.14,1226.77 2050.39,1226.77 2105.51,1171.65 v7(2105.58,1142.22)
  SIG_B0 w6.69: v8(2355.12,694.09) v2(2356.3,672.24)
  Bottom Layer w7.09: v8(2355.12,694.09) 2360.24,688.98 RAD_R63.1@2362.2,688.98
TI_NetR159_2: RAD_R409.1 RAD_U27.3 | length 200.1
  Top Layer w7.09: RAD_U27.3@2507.87,1163.39 2506.89,1163.39 2506.89,1136.81 2562.99,1080.71 2562.99,1039.37 2577.76,1024.61 2577.76,1021.65 2592.52,1006.89 2595.47,1006.89 RAD_R409.1@2598.43,1003.94
TI_NetR186_1: RAD_R186.1 RAD_U8.8 | length 380.3
  Top Layer w7.09: v2(2083.46,746.85) 2109.65,704.13 2109.65,672.44 RAD_R186.1@2090.55,653.54 ; RAD_U8.8@2084.65,1003.74 v7(2084.65,1002.95) v7(2099.41,1002.95)
  PWR_A w6.69: v2(2083.46,746.85) v2@2085.04,881.89
  SIG_A0 w6.69: v7(2084.65,1002.95) v2@2085.04,881.89
  other v2: 2084.84,886.02
TI_NetR190_2: RAD_R190.2 RAD_R292.2 RAD_U8.4 | length 1204.4
  Top Layer w6.69: v7(2353.35,1151.57) 2389.76,1187.99 v21(2404.72,1188.19)
  Top Layer w7.09: RAD_U8.4@2085.63,1082.68 2097.52,1082.68 2097.84,1083 2098,1082.84 v7(2097.64,1082.48) ; v7(2492.91,1068.11) 2498.03,1062.99 RAD_R190.2@2500,1062.99
  SIG_A0 w6.69: v7(2097.64,1082.48) 2143.7,1128.94 2173.23,1128.94 2187.99,1143.7 2187.99,1166.34 2196.85,1175.2 2225.39,1175.2 2241.14,1159.45 2295.28,1159.45 2303.15,1151.57 v7(2353.35,1151.57) ; v21@2404.72,1185.83 2462.99,1129.13 2462.99,1097.64 v7@2491.34,1069.29
  SIG_B0 w6.69: v10(2322.83,1555.12) v8(2452.76,1437.99) ; v8@2469.49,1358.27 2448.82,1232.28 v21(2404.72,1188.19) 2472.44,1255.91 v8(2472.44,1359.25)
  Bottom Layer w6.69: v8(2452.76,1437.99) v8@2469.49,1358.27
TI_NetR193_1: RAD_R193.1 RAD_U8.2 | length 464.5
  Top Layer w6.69: RAD_U8.2@2095.67,1121.85 2124.02,1094.49 v2(2124.02,1082.68)
  SIG_B0 w6: v10(1857.83,792.87) 1902.56,793.31 v8(2048.23,938.98)
  Bottom Layer w6: v8(2048.23,938.98) v2@2123.03,1081.69
  Bottom Layer w6.69: v2@2123.03,1081.69 v2(2124.02,1082.68)
TI_NetR298_1: RAD_R299.2 RAD_R300.1 RAD_R302.2 | length 1044.5
  Top Layer w7.09: v5(989.17,992.13) 998.03,1000.98 998.03,1027.56 1042.32,1071.85 1042.32,1083.66 RAD_R299.2@1043.31,1082.68
  SIG_A0 w6.69: v5(1249.02,859.25) 1320.87,787.4 1574.8,737.2 1592.52,736.22 1619.09,736.22 1642.72,761.81 1643.7,767.72 1649.61,775.59 v9(1673.23,787.4)
  SIG_A1 w7.09: v5(989.17,992.13) 1071.85,992.13 1113.19,1033.46 1136.81,1033.46 1175.2,995.08 1210.63,995.08 1249.02,956.69 v5(1249.02,859.25)
  Bottom Layer w7.09: RAD_R302.2@1220.47,885.83 1219.49,885.83 1222.44,885.83 v5(1249.02,859.25)
TI_NetR304_1: RAD_R305.2 RAD_R307.2 | length 518.4
  Top Layer w6.69: RAD_R307.2@1286.61,821.65 1289.37,856.3 1311.02,875.98 1311.02,895.67 1295.28,909.45 v7(1295.28,942.91)
  SIG_A0 w6.69: v7(1295.28,942.91) v2(1393.7,944.88)
  SIG_B0 w6.69: v2(1393.7,944.88) 1490.16,925.2 1588.58,830.71 1598.43,826.77 v8(1608.27,816.93)
  Bottom Layer w6.69: v8(1608.27,816.93) RAD_R305.2@1609.06,794.49
TI_NetR308_1: RAD_R310.2 RAD_R311.1 RAD_R313.2 | length 494.2
  Top Layer w7.09: v5(1139.76,876.97) 1148.62,885.83 1160.43,885.83 RAD_R311.1@1161.42,885.83
  SIG_A1 w7.09: v5(1125,1012.8) 1157.48,980.32 1201.77,980.32 1210.63,971.46 1210.63,947.83 v5(1139.76,876.97)
  Bottom Layer w7.09: RAD_R313.2@1043.31,1122.05 1042.32,1122.05 1080.71,1122.05 1083.66,1125 1122.05,1125 1122.05,1122.05 1125,1119.09 1125,1045.28 1110.24,1030.51 1110.24,1021.65 1104.33,1015.75 1104.33,1006.89 RAD_R310.2@1101.38,1003.94 ; RAD_R310.2@1102.36,1003.94 RAD_R310.2@1101.38,1003.94 ; v5(1125,1012.8) 1116.14,1003.94 RAD_R310.2@1101.38,1003.94
TI_NetR380_2: RAD_U29.T13
TI_NetR381_2: RAD_U29.V12
TI_NetR386_2: RAD_R386.2 RAD_U29.D15 | length 1297.9
  Top Layer w6.69: v9(1675.69,1157.48) RAD_U29.D15@1676.41,1157.86
  SIG_A0 w6.69: v2(1282.97,721.95) 1294.78,717.52 1370.08,721.95 1389.27,738.19 1504.43,732.28 1582.68,721.95 1774.61,724.9 1829.23,781 1827.76,803.15 1688.98,946.36 1683.07,1077.76 1660.93,1101.38 1659.45,1140.75 1662.4,1144.19 v9(1675.69,1157.48)
  SIG_B0 w6.69: v10(1130.91,910.93) 1207.68,881.4 1228.35,845.96 1229.82,775.1 v2(1282.97,721.95)
  Bottom Layer w6.69: RAD_R386.2@1129.13,910.63 v10(1130.91,910.93)
TI_NetR392_2: RAD_U29.U16
TI_NetTP8_1: RAD_TP8.1 RAD_U8.22 | length 840.5
  Top Layer w6.69: RAD_TP8.1@1988.19,688.98 1987.2,687.99 1999.02,699.8 v2(2004.92,699.8) ; v2(2211.61,1254.92) 2267.72,1198.82 2267.72,1163.39 ; RAD_U8.22@2246.06,1122.05 2247.05,1122.05 RAD_U8.22@2252.95,1122.05 ; RAD_U8.22@2257.09,1122.24 2265.75,1126.97 2272.64,1133.86 2272.64,1158.46 2267.72,1163.39 ; 2270.67,1163.39 2267.72,1163.39
  SIG_B1 w6.69: v2(2004.92,699.8) 2140.75,835.63 2140.75,1039.37 2211.61,1110.24 v2(2211.61,1254.92)
TI_NRSTOUT: RAD_R99.2 RAD_U8.6 | length 786.5
  Top Layer w6.69: RAD_U8.6@2097.64,1043.11 v7(2124.02,1016.73) ; v7(2335.43,872.44) 2385.83,872.44 2437.8,924.41 2437.01,952.76 2462.6,901.57 2469.49,897.64 2522.64,897.64 2529.53,901.57 2531.5,904.53 2531.5,952.76 RAD_R99.2@2500,984.25
  Top Layer w7.09: RAD_U8.6@2085.63,1043.31 2097.64,1043.31 RAD_U8.6@2097.64,1043.11
  SIG_A0 w6.69: v7(2124.02,1016.73) 2127.56,886.61 2163.78,850.39 2313.39,850.39 v7(2335.43,872.44)
TI_OSC_CLK_OUT_ETHERNET: RAD_U29.B11
TI_OSC_CLKTOP: RAD_U29.A11
TI_PMIC_CLK: RAD_R75.1
TI_PMIC_CLK_OUT: RAD_R218.1 RAD_U29.T17 | length 420.5
  SIG_A0 w6.69: v9(1371.48,1108.85) 1413.39,1063.98 1460.63,963.58 1461.61,955.71 1588.58,828.74 1594.49,827.76 1602.36,821.85 1605.32,815.94 v9(1614.17,778.74)
TI_PMIC_EN: RAD_R125.1 RAD_U8.15 | length 438.2
  Top Layer w6.69: v7(2225.58,983.08) v7(2243.11,980.32) 2243.11,954.72 2265.75,932.09 2265.75,886.81 v7(2250,871.06) ; v7(2336.61,725.39) RAD_R125.1@2342.52,708.66
  SIG_A0 w6.69: v7@2251.97,869.29 2314.96,900.79 2333.86,900.79 2352.76,881.89 2352.76,744.88 v7@2335.43,727.56
TI_PMIC_NINT: RAD_R13.2 RAD_R17.2 RAD_R106.1 RAD_U8.7 | length 888.6
  Top Layer w6.69: v7(2053.15,1031.5) 2060.04,1018.7 RAD_U8.7@2083.17,1023.62
  Top Layer w7.09: RAD_R13.2@1771.65,984.25 1771.65,983.27 1786.42,968.5 1789.37,968.5 v7(1792.32,965.55) 1792.32,909.45 1768.7,885.83 1768.7,847.44 1807.09,809.06 1830.71,809.06 1866.14,773.62 1866.14,741.14 1869.09,738.19 1870.08,737.5 ; RAD_R106.1@1870.08,767.72 1870.08,737.5 ; RAD_R17.2@2047.24,688.98 2047.24,700 2023.32,723.92 1883.66,723.92 1870.08,737.5
  SIG_A0 w6.69: v7(1792.32,965.55) 1798.43,959.06 1981.1,959.06 v7(2053.15,1031.5)
TI_PMIC_SPI_CLK: RAD_R63.2
TI_PMIC_SPI_CS0: RAD_R190.1
TI_PMIC_SPI_MISO: RAD_R193.2
TI_PMIC_SPI_MOSI: RAD_R186.2
TI_PMICOUT_1V0: RAD_C132.1 RAD_C134.1 RAD_L8.2 RAD_R71.2 RAD_R73.1 RAD_R111.1 | length 1452.9
  Top Layer w9.84: RAD_R111.1@1852.36,944.88 1851.38,944.88 1866.14,959.65 1872.05,959.65 1875,962.6 1877.95,962.6 1880.91,965.55 1883.86,965.55 1886.81,968.5 1886.81,971.46 1889.76,974.41 1889.76,989.17 1910.43,1009.84 RAD_C134.1@1909.45,1008.86 ; v6(2161.42,897.64) 2164.37,900.59 2164.37,921.26 RAD_L8.2@2165.35,921.26
  Top Layer w15.75: v7(1903.54,1045.28) RAD_C134.1@1935.24,997.34
  SIG_A0 w15.75: v2(1826.77,1169.29) 1846.46,1149.61 1844.49,1096.46 1860.24,1084.65 v7(1903.54,1045.28)
  SIG_A1 w9.84: v2(2147.64,814.96) 2152.56,856.3 ; v6(2161.42,897.64) 2161.42,894.68 2152.56,885.83 2152.56,882.87 2149.61,879.92 2149.61,862.2 2152.56,859.25 2152.56,856.3 ; v5(2483.27,874.02) 2471.46,874.02 2465.55,868.11 2300.2,868.11 2288.39,856.3 2193.9,856.3 2185.04,847.44 2164.37,847.44 2161.42,850.39 2158.46,850.39 2152.56,856.3
  SIG_B0 w15.75: v2(1826.77,1169.29) 1891.73,1125.98 v8(2082.68,935.04)
  Bottom Layer w9.84: RAD_R71.2@1952.36,733.86 2039.37,734.25 2120.08,814.96 v2(2147.64,814.96) ; RAD_R73.1@2458.66,846.46 2459.65,847.44 2477.36,865.16 2477.36,868.11 v5(2483.27,874.02)
  Bottom Layer w15.75: v8(2082.68,935.04) 2100.39,917.32 RAD_C132.1@2119.88,918.01
  Bottom Layer w21.65: RAD_C132.1@2145.67,906.5 v6(2161.42,897.64)
TI_PMICOUT_1V2: RAD_C129.1 RAD_C130.1 RAD_L2.2 RAD_R30.1 RAD_R32.1 RAD_R291.2 | length 2605.8
  Top Layer w9.84: RAD_R30.1@1043.31,891.73 1042.32,891.73 1042.32,865.16 v5(1060.04,847.44) ; v5(1833.66,897.64) 1845.47,909.45 1922.24,909.45 1928.15,903.54 1928.15,874.02 1954.72,847.44 RAD_C129.1@1953.74,846.46 ; v6(2320.87,1051.18) 2323.82,1048.23 2323.82,1027.56 RAD_L2.2@2322.83,1027.56
  SIG_A1 w9.84: v5(1060.04,847.44) 1068.9,838.58 1068.9,820.87 1071.85,817.91 1071.85,812.01 1172.24,711.61 1175.2,711.61 1231.3,655.51 1240.16,655.51 1251.97,643.7 1334.65,643.7 1340.55,637.8 1455.71,637.8 1467.52,625.98 1470.47,625.98 1473.43,623.03 1517.72,623.03 1523.62,617.13 1526.57,617.13 1529.53,614.17 1547.24,614.17 1550.2,617.13 1553.15,617.13 1559.06,623.03 1559.06,625.98 v5(1570.87,637.8) ; v5(1765.75,817.91) 1821.85,874.02 1821.85,885.83 v5(1833.66,897.64) ; v5(1999.02,1133.86) 2013.78,1133.86 2037.4,1157.48 2040.35,1157.48 2043.31,1160.43 2223.43,1160.43 2235.24,1172.24 2238.19,1172.24 2241.14,1175.2 2258.86,1175.2 2261.81,1172.24 2264.76,1172.24 2314.96,1122.05 2314.96,1057.09 v6(2320.87,1051.18)
  Bottom Layer w8.66: v5(1833.66,897.64) 1832.68,897.64 1840.55,905.51 1893.7,905.51 1895.67,907.48 1897.64,907.48 1899.61,909.45 1899.61,962.6 1905.51,968.5 1905.51,1011.81 1946.85,1053.15 1946.85,1055.12 RAD_C130.1@1948.82,1057.09
  Bottom Layer w9.84: RAD_R32.1@1515.75,708.66 RAD_R32.1@1514.76,708.66 ; v5(1570.87,637.8) 1573.82,634.84 1585.63,634.84 1597.44,623.03 1626.97,623.03 1629.92,625.98 1632.87,625.98 1635.83,628.94 1635.83,631.89 1638.78,634.84 1638.78,705.71 1635.83,708.66 1635.83,711.61 1632.87,711.61 1629.92,714.57 1591.54,714.57 1573.82,732.28 1535.43,732.28 ; v5(1765.75,817.91) 1774.61,826.77 1774.61,829.72 RAD_R291.2@1792.32,847.44 ; RAD_R291.2@1791.34,846.46 RAD_R291.2@1792.32,847.44 ; RAD_C130.1@1948.82,1058.07 1948.82,1057.09 1999.02,1107.28 v5(1999.02,1133.86) ; RAD_R32.1@1514.76,708.66 1529.53,723.43 1529.53,726.38 1535.43,732.28 ; RAD_R32.1@1514.76,708.66 1514.76,711.61 1535.43,732.28 ; 1535.43,732.28 1585.63,732.28 1594.49,723.43 1653.54,723.43 1671.26,705.71 1674.21,705.71 1677.17,702.76 1715.55,702.76 1733.27,685.04 1810.04,685.04 1815.94,690.94 1815.94,726.38 1810.04,732.28 1810.04,744.09 1786.42,767.72 1786.42,841.54 RAD_R291.2@1792.32,847.44
TI_PMICOUT_1V8: RAD_C60.1 RAD_C125.1 RAD_L9.2 RAD_R14.2 RAD_R104.1 | length 6513.3
  Top Layer w8.66: v2(1812.99,915.35) 1810.04,912.4 1810.04,891.73 1812.99,888.78 1812.99,882.87 1815.94,882.87 1815.94,879.92 1830.71,865.16 RAD_R14.2@1830.71,866.14 ; v2(1960.63,1021.65) 1960.63,1009.84 1963.58,1006.89
  Top Layer w9.84: RAD_C125.1@1948.82,1146.65 1948.82,1145.67 1948.82,1107.28 1951.77,1104.33 1951.77,1101.38 1954.72,1098.43 1954.72,1033.46 1963.58,1024.61 1963.58,1006.89 1981.3,989.17 1993.11,989.17 1999.02,983.27 2004.92,983.27 RAD_L9.2@2007.87,980.32
  Top Layer w15.75: v9(2559.06,926.18) v9(2578.74,926.18)
  PWR_A w7.87: v2(773.62,2176.18) 787.4,2175.2 832.64,2175.2 2214.57,2175.2 ; 2618.11,1564.96 2618.11,1771.65 ; v13(2677.17,901.57) 2687.01,905.51 2716.54,905.51 2729.92,918.9 2814.96,1003.94 2814.96,1368.11
  PWR_B w7.87: 2027.56,905.51 1966.84,966.23 1958.66,974.41 1958.66,1013.78 v2(1960.63,1021.65) 1948.82,1023.62 1915.53,990.33 1879.92,954.72 1855.15,954.72 1850.39,954.72 v2(1812.99,915.35) 1830.71,935.04 1863.28,935.04 1879.92,935.04 2037.4,777.56 ; 2253.94,807.09 2224.41,777.56 2253.94,807.09 ; 2253.94,807.09 2372.05,807.09 ; 2253.94,807.09 2372.05,807.09 ; 2372.05,807.09 2421.26,757.87 ; 2372.05,807.09 2421.26,757.87 ; 2421.26,757.87 2559.06,757.87 2421.26,757.87 ; 2677.17,875.98 2653.5,852.32 2677.17,875.98 ; 2677.17,875.98 v13(2677.17,901.57) 2677.17,875.98
  SIG_A0 w15.75: v9(2559.06,926.18) v9(2578.74,926.18) v13(2677.17,901.57)
  SIG_B1 w8.66: v2(773.62,2176.18) 1092.52,2176.18 1210.63,2294.29 1231.3,2294.29 1340.55,2185.04 1340.55,1886.81 1706.69,1520.67 1706.69,1189.96 1683.07,1166.34 1658.46,1142.72 1658.46,1069.88 1683.07,1045.28 v2(1812.99,915.35) 1860.24,962.6 1901.57,962.6 v2(1960.63,1021.65)
  Bottom Layer w8.66: RAD_C60.1@728.35,2196.85 729.33,2196.85 741.14,2185.04 764.76,2185.04 v2(773.62,2176.18)